# Altium PCB MacroPlay.PcbDoc (part 1 of 2)
Units mm, origin at the board's own origin, x right, y up, seen from the top; angles counter-clockwise.
Board outline 100 x 85.02 mm, 2 copper layers (Top Layer, Bottom Layer), stack 1.569 mm thick; 92 components, 57 nets, 335 pads, 121 vias.
Unrouted connection lines stored in the file: 18.
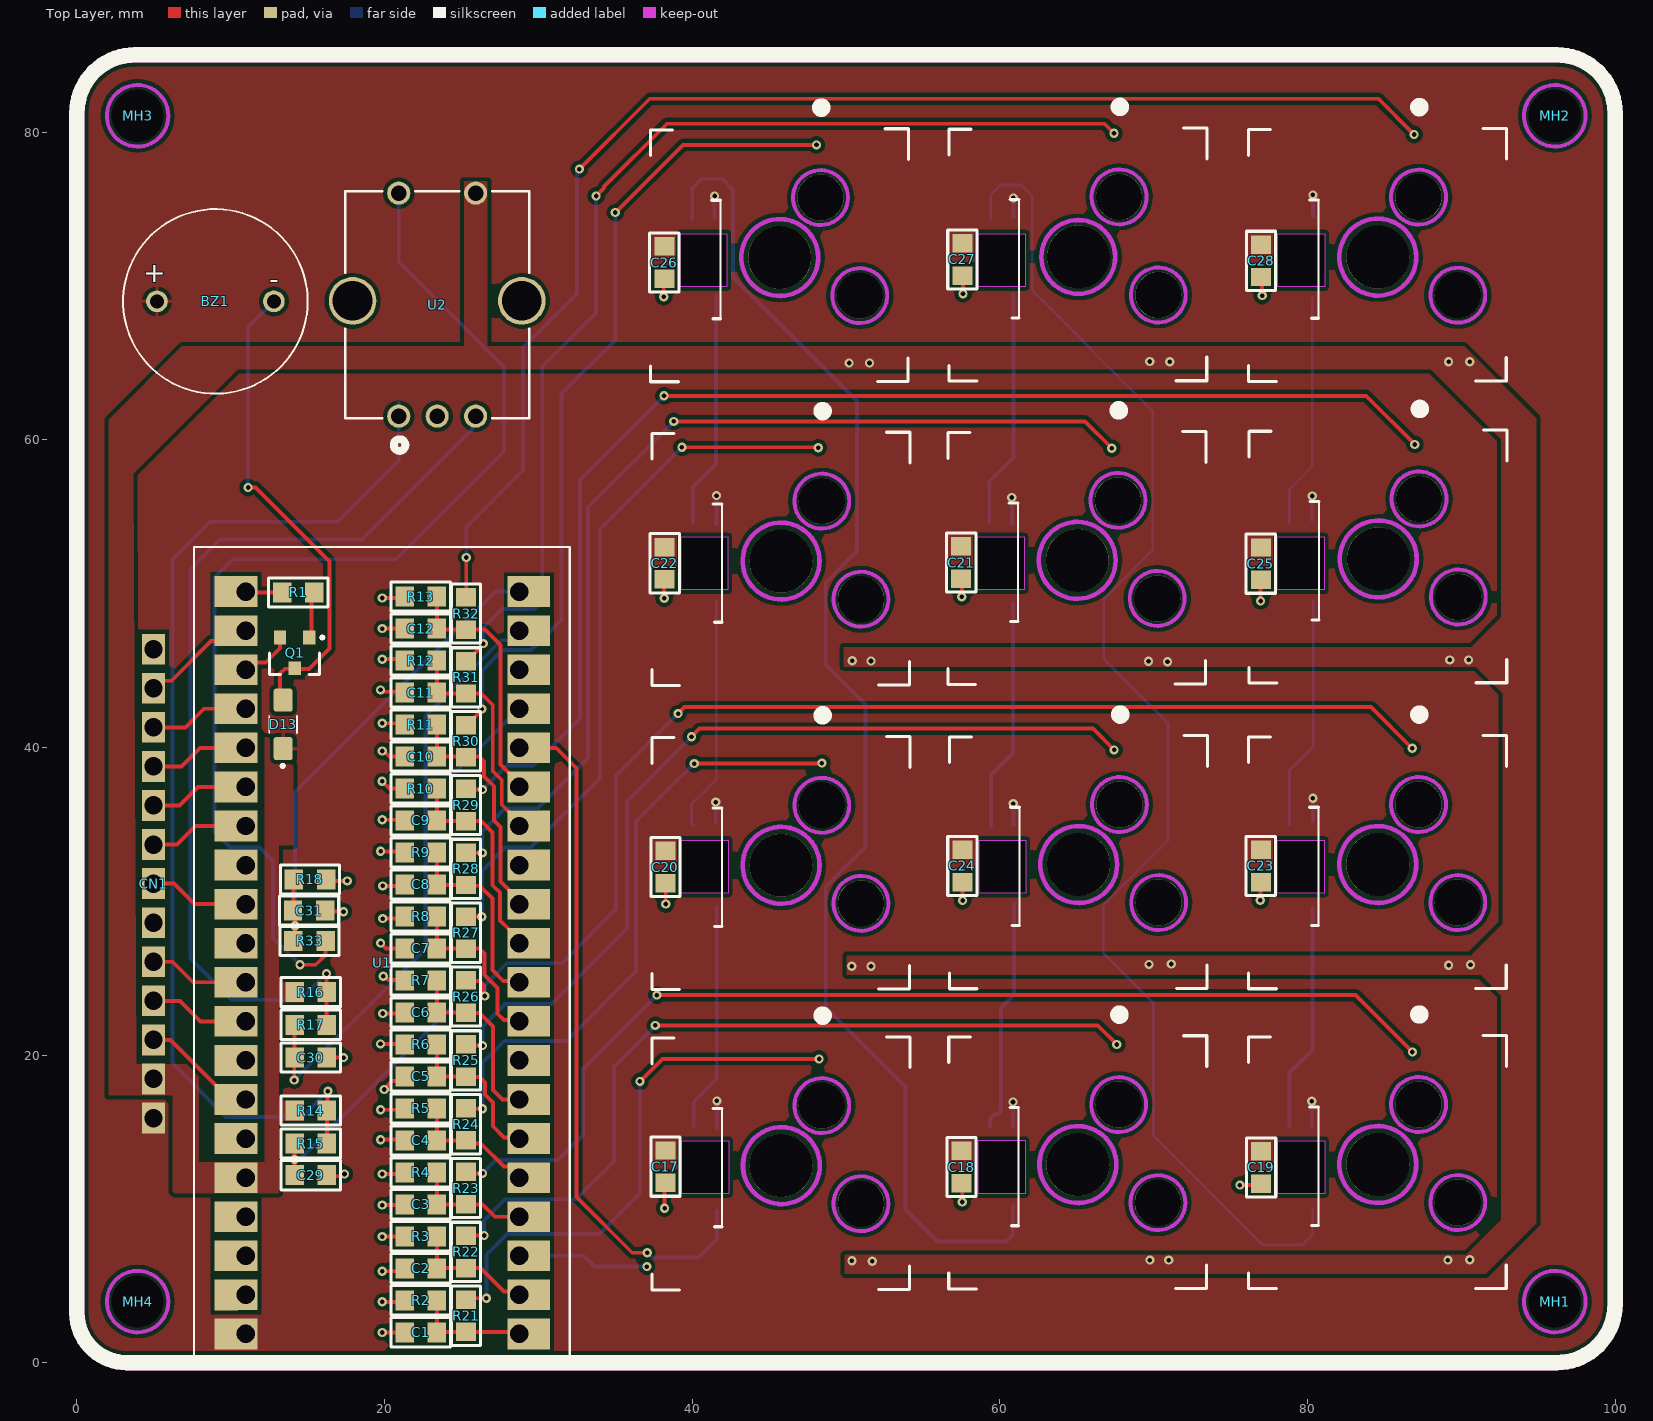
[diagram p0: Top Layer view]
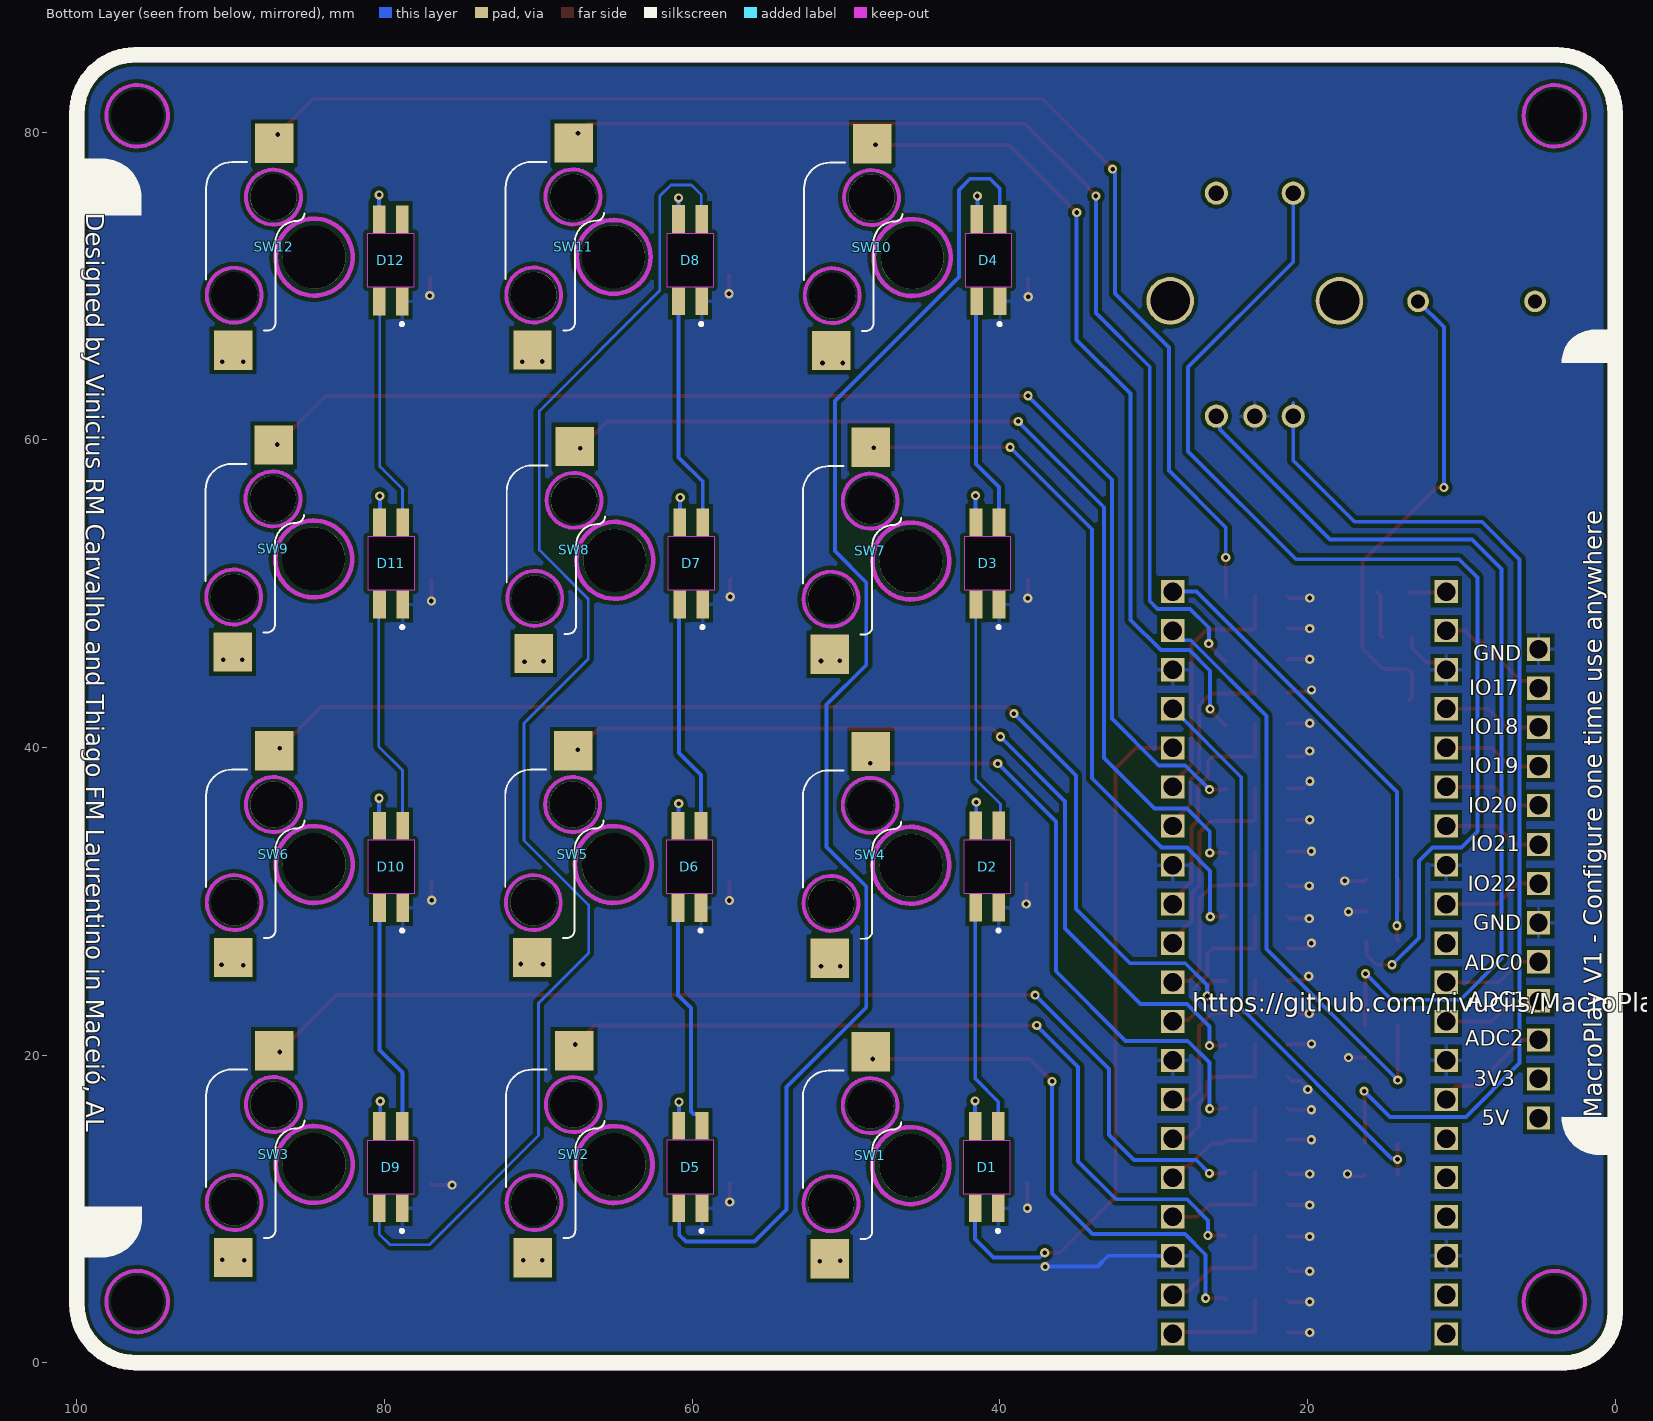
[diagram p1: Bottom Layer view, seen from below]

## Layer stack, top to bottom
Top Solder: solder mask 0.0102, Solder Resist, Dk 3.5
Top Layer: signal copper 0.035
Dielectric 1: core 1.4986, Core-043, Dk 4.3
Bottom Layer: signal copper 0.035
Bottom Solder: solder mask 0.0102, Solder Resist, Dk 3.5

## Board outline
27.033,0.007 12.677,0.007 3.233,0.007 cw(c3.233,3.245) -0.005,3.245 -0.005,81.245 cw(c3.775,81.245) 3.775,85.025 96.211,85.025 cw(c96.211,81.241) 99.995,81.241 99.995,3.801 cw(c96.201,3.801) 96.201,0.007

## Design rules (kind name [scope] priority, off if disabled: settings)
Clearance Clearance_LED [IsBoardCutoutRegion vs IsPad] p1: gap=0 ignorepadtopadclearanceinfootprint=FALSE
Clearance [All] p2: gap=0.254 ignorepadtopadclearanceinfootprint=FALSE except(0: Arc-Hole Track-Hole SMDPad-Hole THPad-Hole Via-Hole Fill-Hole Poly-Hole Region-Hole Text-Hole)
ComponentClearance TestPoints [HasFootprint('Test Point') vs HasFootprint('Test Point')] p1: gap=1.016 collisioncheckmode=3 verticalgap=0.254 showdistances=FALSE
ComponentClearance [All] p2: gap=0.254 collisioncheckmode=3 verticalgap=0.254 showdistances=FALSE
Height [All] p1: minheight=0 maxheight=50 prefheight=12.7
HoleSize [All] p1: absolutevalues=TRUE maxlimit=10 minlimit=0.025 maxpercent=80.000 minpercent=20.000
PolygonConnect "Relief 2312" [(HasFootprint('C2312') OR HasFootprint('R2312')OR HasFootprint('L2312')) AND IsPad vs IsPolygon] p1: thpad.connectstyle=Relief thpad.reliefconductorwidth=1.5 thpad.reliefentries=4 thpad.polygonreliefangle="90 Angle" thpad.airgapwidth=0.2 smdpad.connectstyle=Relief smdpad.reliefconductorwidth=1.5 smdpad.reliefentries=4 smdpad.polygonreliefangle="90 Angle" smdpad.airgapwidth=0.2 via.connectstyle=Direct via.reliefconductorwidth=0.254 via.reliefentries=4 via.polygonreliefangle="90 Angle" via.airgapwidth=0.254
PolygonConnect "Relief 1206" [(HasFootprint('C1206') OR HasFootprint('R1206') or HasFootprint('L1206')) AND IsPad vs IsPolygon] p2: thpad.connectstyle=Relief thpad.reliefconductorwidth=1.1 thpad.reliefentries=4 thpad.polygonreliefangle="90 Angle" thpad.airgapwidth=0.2 smdpad.connectstyle=Relief smdpad.reliefconductorwidth=1.1 smdpad.reliefentries=4 smdpad.polygonreliefangle="90 Angle" smdpad.airgapwidth=0.2 via.connectstyle=Direct via.reliefconductorwidth=0.254 via.reliefentries=4 via.polygonreliefangle="90 Angle" via.airgapwidth=0.254
PolygonConnect "Relief 0806" [(HasFootprint('C0805') OR HasFootprint('R0805') OR HasFootprint('L0805')) AND IsPad vs IsPolygon] p3: thpad.connectstyle=Relief thpad.reliefconductorwidth=0.7 thpad.reliefentries=4 thpad.polygonreliefangle="90 Angle" thpad.airgapwidth=0.254 smdpad.connectstyle=Relief smdpad.reliefconductorwidth=0.7 smdpad.reliefentries=4 smdpad.polygonreliefangle="90 Angle" smdpad.airgapwidth=0.254 via.connectstyle=Direct via.reliefconductorwidth=0.254 via.reliefentries=4 via.polygonreliefangle="90 Angle" via.airgapwidth=0.254
PolygonConnect "Relief 0603" [(HasFootprint('C0603') OR HasFootprint('R0603') OR HasFootprint('L0603')) AND IsPad vs IsPolygon] p4: thpad.connectstyle=Relief thpad.reliefconductorwidth=0.5 thpad.reliefentries=4 thpad.polygonreliefangle="90 Angle" thpad.airgapwidth=0.254 smdpad.connectstyle=Relief smdpad.reliefconductorwidth=0.5 smdpad.reliefentries=4 smdpad.polygonreliefangle="90 Angle" smdpad.airgapwidth=0.254 via.connectstyle=Direct via.reliefconductorwidth=0.254 via.reliefentries=4 via.polygonreliefangle="90 Angle" via.airgapwidth=0.254
PolygonConnect "Relief 0402" [(HasFootprint('C0402') OR HasFootprint('R0402') OR HasFootprint('L0402')) AND IsPad vs IsPolygon] p5: thpad.connectstyle=Relief thpad.reliefconductorwidth=0.3 thpad.reliefentries=4 thpad.polygonreliefangle="90 Angle" thpad.airgapwidth=0.127 smdpad.connectstyle=Relief smdpad.reliefconductorwidth=0.3 smdpad.reliefentries=4 smdpad.polygonreliefangle="90 Angle" smdpad.airgapwidth=0.127 via.connectstyle=Direct via.reliefconductorwidth=0.254 via.reliefentries=4 via.polygonreliefangle="90 Angle" via.airgapwidth=0.254
PolygonConnect [All] p6: thpad.connectstyle=Relief thpad.reliefconductorwidth=0.254 thpad.reliefentries=4 thpad.polygonreliefangle="90 Angle" thpad.airgapwidth=0.254 smdpad.connectstyle=Relief smdpad.reliefconductorwidth=0.254 smdpad.reliefentries=4 smdpad.polygonreliefangle="90 Angle" smdpad.airgapwidth=0.254 via.connectstyle=Direct via.reliefconductorwidth=0.254 via.reliefentries=4 via.polygonreliefangle="90 Angle" via.airgapwidth=0.254
RoutingVias [All] p1: holewidth=0.3 width=0.6 viastyle="Through Hole" minholewidth=0.3 minwidth=0.6 maxholewidth=8 maxwidth=10
SilkToSilkClearance SilkToSilkClearance_textOnTop [OnLayer('Top Overlay') vs (IsText OR IsTrack) AND OnLayer('Top Overlay')] p1: silktosilkclearance=0
SilkToSilkClearance SilkToSilkClearance_textOnTop_1 [OnLayer('Bottom Overlay') vs (IsText OR IsTrack) AND OnLayer('Bottom Overlay')] p2: silktosilkclearance=0
SilkToSilkClearance [All] p3: silktosilkclearance=0.254
SilkToSolderMaskClearance [IsPad] p1: minsilkscreentomaskgap=0.16 clearancetoexposedcopper=TRUE
SolderMaskExpansion [All] p1: expansion=0.102 istentingtop=FALSE
SupplyNets "Schematic Supply Nets_2" [InNet('+VBUS')] p1: voltage=0.000
SupplyNets "Schematic Supply Nets_1" [InNet('+3V3')] p2: voltage=0.000
SupplyNets "Schematic Supply Nets" [InNet('GND')] p3: voltage=0.000
Width [All] p1: maxlimit=10 minlimit=0.16 preferedwidth=0.254
25 further rules are at their usual default settings.

## Classes and differential pairs
component class "[05] - LEDS": C17 C18 C19 C20 C21 C22 C23 C24 C25 C26 C27 C28 D1 D2 D3 D4 D5 D6 D7 D8 D9 D10 D11 D12
component class "[04] - KEYS": C1 C2 C3 C4 C5 C6 C7 C8 C9 C10 C11 C12 R2 R3 R4 R5 R6 R7 R8 R9 R10 R11 R12 R13 R21 R22 R23 R24 R25 R26 R27 R28 R29 R30 R31 R32 SW1 SW2 SW3 SW4 SW5 SW6 SW7 SW8 SW9 SW10 SW11 SW12
component class "[03] - MICROCONTROLLER": BZ1 C29 C30 C31 CN1 D13 Q1 R1 R14 R15 R16 R17 R18 R33 U1 U2

## Components (designator, comment, footprint, x,y, rotation, side; value= is the part's Value field where it differs from the comment)
BZ1 "CMI-1275C-050" CUI_CMI-1275C-050 9,69 r0 top
C1 "100nF/50V" "C0805 - IRONSOLDERING" 22.345,1.983 r0 top value=100nF
C2 "100nF/50V" "C0805 - IRONSOLDERING" 22.345,6.142 r0 top value=100nF
C3 "100nF/50V" "C0805 - IRONSOLDERING" 22.345,10.3 r0 top value=100nF
C4 "100nF/50V" "C0805 - IRONSOLDERING" 22.345,14.459 r0 top value=100nF
C5 "100nF/50V" "C0805 - IRONSOLDERING" 22.345,18.618 r0 top value=100nF
C6 "100nF/50V" "C0805 - IRONSOLDERING" 22.345,22.777 r0 top value=100nF
C7 "100nF/50V" "C0805 - IRONSOLDERING" 22.345,26.935 r0 top value=100nF
C8 "100nF/50V" "C0805 - IRONSOLDERING" 22.345,31.094 r0 top value=100nF
C9 "100nF/50V" "C0805 - IRONSOLDERING" 22.345,35.253 r0 top value=100nF
C10 "100nF/50V" "C0805 - IRONSOLDERING" 22.345,39.411 r0 top value=100nF
C11 "100nF/50V" "C0805 - IRONSOLDERING" 22.345,43.57 r0 top value=100nF
C12 "100nF/50V" "C0805 - IRONSOLDERING" 22.345,47.729 r0 top value=100nF
C17 "100nF/50V" "C0805 - IRONSOLDERING" 38.258,12.75 r90 top value=100nF
C18 "100nF/50V" "C0805 - IRONSOLDERING" 57.508,12.725 r90 top value=100nF
C19 "100nF/50V" "C0805 - IRONSOLDERING" 76.983,12.7 r90 top value=100nF
C20 "100nF/50V" "C0805 - IRONSOLDERING" 38.258,32.225 r90 top value=100nF
C21 "100nF/50V" "C0805 - IRONSOLDERING" 57.483,52.025 r90 top value=100nF
C22 "100nF/50V" "C0805 - IRONSOLDERING" 38.208,51.975 r90 top value=100nF
C23 "100nF/50V" "C0805 - IRONSOLDERING" 76.958,32.3 r90 top value=100nF
C24 "100nF/50V" "C0805 - IRONSOLDERING" 57.558,32.3 r90 top value=100nF
C25 "100nF/50V" "C0805 - IRONSOLDERING" 76.958,51.95 r90 top value=100nF
C26 "100nF/50V" "C0805 - IRONSOLDERING" 38.183,71.525 r90 top value=100nF
C27 "100nF/50V" "C0805 - IRONSOLDERING" 57.558,71.725 r90 top value=100nF
C28 "100nF/50V" "C0805 - IRONSOLDERING" 76.98,71.635 r90 top value=100nF
C29 "100nF/50V" "C0805 - IRONSOLDERING" 15.195,12.195 r180 top value=100nF
C30 "100nF/50V" "C0805 - IRONSOLDERING" 15.195,19.845 r180 top value=100nF
C31 "100nF/50V" "C0805 - IRONSOLDERING" 15.095,29.395 r180 top value=100nF
CN1 "12PIN_HEADER" 12PINHEADER 4.975,31.15 r0 top
D1 "SK6812-E" LED_SK6812-E 40.845,12.72 r90 top locked
D2 "SK6812-E" LED_SK6812-E 40.808,32.25 r90 top
D3 "SK6812-E" LED_SK6812-E 40.795,51.97 r90 top locked
D4 "SK6812-E" LED_SK6812-E 40.733,71.675 r90 top
D5 "SK6812-E" LED_SK6812-E 60.108,12.725 r90 top
D6 "SK6812-E" LED_SK6812-E 60.17,32.245 r90 top
D7 "SK6812-E" LED_SK6812-E 60.058,51.975 r90 top
D8 "SK6812-E" LED_SK6812-E 60.133,71.675 r90 top
D9 "SK6812-E" LED_SK6812-E 79.595,12.72 r90 top locked
D10 "SK6812-E" LED_SK6812-E 79.57,32.245 r90 top locked
D11 "SK6812-E" LED_SK6812-E 79.57,51.97 r90 top locked
D12 "SK6812-E" LED_SK6812-E 79.595,71.67 r90 top locked
D13 "1N4007FL" SODFL3618X110N 13.4,41.5 r90 top
MH1 "MH_7.4MMC_3.2MMD" MH_7.4MMC_3.2MMD#1 96.238,3.977 r0 top
MH2 "MH_7.4MMC_3.2MMD" MH_7.4MMC_3.2MMD#2 98.904,81.065 r0 top
MH3 "MH_7.4MMC_3.2MMD" MH_7.4MMC_3.2MMD#3 4.535,84.302 r0 top
MH4 "MH_7.4MMC_3.2MMD" MH_7.4MMC_3.2MMD#4 3.014,4.904 r0 top
Q1 "MMBT2222A,215" SOT-23-3 14.15,46.15 r270 top
R1 "1K" "R0805 - IRONSOLDERING" 14.383,50.1 r0 top value=1kΩ
R2 "10K" "R0805 - IRONSOLDERING" 22.345,4.087 r0 top value=10kΩ
R3 "10K" "R0805 - IRONSOLDERING" 22.345,8.246 r0 top value=10kΩ
R4 "10K" "R0805 - IRONSOLDERING" 22.345,12.355 r180 top value=10kΩ
R5 "10K" "R0805 - IRONSOLDERING" 22.345,16.513 r180 top value=10kΩ
R6 "10K" "R0805 - IRONSOLDERING" 22.345,20.672 r180 top value=10kΩ
R7 "10K" "R0805 - IRONSOLDERING" 22.345,24.881 r0 top value=10kΩ
R8 "10K" "R0805 - IRONSOLDERING" 22.345,29.04 r0 top value=10kΩ
R9 "10K" "R0805 - IRONSOLDERING" 22.345,33.198 r0 top value=10kΩ
R10 "10K" "R0805 - IRONSOLDERING" 22.345,37.307 r180 top value=10kΩ
R11 "10K" "R0805 - IRONSOLDERING" 22.345,41.466 r180 top value=10kΩ
R12 "10K" "R0805 - IRONSOLDERING" 22.345,45.624 r180 top value=10kΩ
R13 "10K" "R0805 - IRONSOLDERING" 22.345,49.783 r180 top value=10kΩ
R14 "10K" "R0805 - IRONSOLDERING" 15.195,16.37 r180 top value=10kΩ
R15 "1K" "R0805 - IRONSOLDERING" 15.195,14.27 r0 top value=1kΩ
R16 "10K" "R0805 - IRONSOLDERING" 15.195,24.07 r180 top value=10kΩ
R17 "1K" "R0805 - IRONSOLDERING" 15.195,21.995 r0 top value=1kΩ
R18 "10K" "R0805 - IRONSOLDERING" 15.145,31.395 r180 top value=10kΩ
R21 "1K" "R0805 - IRONSOLDERING" 25.27,3.058 r90 top value=1kΩ
R22 "1K" "R0805 - IRONSOLDERING" 25.27,7.208 r90 top value=1kΩ
R23 "1K" "R0805 - IRONSOLDERING" 25.27,11.358 r90 top value=1kΩ
R24 "1K" "R0805 - IRONSOLDERING" 25.27,15.508 r90 top value=1kΩ
R25 "1K" "R0805 - IRONSOLDERING" 25.27,19.658 r90 top value=1kΩ
R26 "1K" "R0805 - IRONSOLDERING" 25.27,23.808 r90 top value=1kΩ
R27 "1K" "R0805 - IRONSOLDERING" 25.27,27.958 r90 top value=1kΩ
R28 "1K" "R0805 - IRONSOLDERING" 25.27,32.108 r90 top value=1kΩ
R29 "1K" "R0805 - IRONSOLDERING" 25.27,36.258 r90 top value=1kΩ
R30 "1K" "R0805 - IRONSOLDERING" 25.27,40.408 r90 top value=1kΩ
R31 "1K" "R0805 - IRONSOLDERING" 25.27,44.558 r90 top value=1kΩ
R32 "1K" "R0805 - IRONSOLDERING" 25.27,48.708 r90 top value=1kΩ
R33 "1K" "R0805 - IRONSOLDERING" 15.12,27.395 r180 top value=1kΩ
SW1 "PG151101S11" SW_PG151101S11 49.697,13.491 r90 top locked
SW2 "PG151101S11" SW_PG151101S11 68.997,13.557 r90 top locked
SW3 "PG151101S11" SW_PG151101S11 88.494,13.566 r90 top locked
SW4 "PG151101S11" SW_PG151101S11 49.697,33.016 r90 top locked
SW5 "PG151101S11" SW_PG151101S11 69.047,33.066 r90 top locked
SW6 "PG151101S11" SW_PG151101S11 88.494,33.066 r90 top locked
SW7 "PG151101S11" SW_PG151101S11 49.697,52.791 r90 top locked
SW8 "PG151101S11" SW_PG151101S11 68.951,52.841 r90 top locked
SW9 "PG151101S11" SW_PG151101S11 88.526,52.933 r90 top locked
SW10 "PG151101S11" SW_PG151101S11 49.614,72.524 r90 top locked
SW11 "PG151101S11" SW_PG151101S11 69.024,72.566 r90 top locked
SW12 "PG151101S11" SW_PG151101S11 88.494,72.552 r90 top locked
U1 "RASPBERRY_PI_PICO" RASPBERRY_PI_PICO 19.86,24.735 r180 top locked
U2 "EC11E18244A5" EC11E18244A5_ALPS 23.42,69.037 r0 top

## Footprints (in the part's own frame and the unit in brackets; to place one, negate y for a bottom-side part, rotate by r counter-clockwise, add the part's x,y. Pads: shape width x height; smd on the part's side, far side on the other; paste and mask are expansions set on the pad)
12PINHEADER [mm]
  rect 1.508x2 / inner round 1.508 / far side rect 1.508x1.508 hole 1.2 mask+0.1: 1(0,15.24) 2(0,12.7) 3(0,10.16) 4(0,7.62) 5(0,5.08) 6(0,2.54) 7(0,0) 8(0,-2.54) 9(0,-5.08) 10(0,-7.62) 11(0,-10.16) 12(0,-12.7) 13(0,-15.24)
"C0805 - IRONSOLDERING" [mm]
  rect 1.2x1.3 smd: 1(-1.05,0) 2(1.05,0)
  silkscreen extent -1.92,-0.95 1.92,0.95, body extent -1,-0.62 1,0.63, height 1
CUI_CMI-1275C-050 [mm]
  round 1.408 hole 0.9: N(3.8,0) P(-3.8,0)
  silkscreen extent -6,-6 6,6, body extent -6.02,-5.9 5.98,6.1, height 7.6
EC11E18244A5_ALPS [mil]
  round 122 hole 102 paste-99999 mask-61: 6(-216.54,0) 7(216.54,0)
  round 59 hole 39 paste-99999 mask+0: A(-98.43,-295.28) B(98.43,-295.28) C(0,-295.28) D(-98.43,275.59) E(98.43,275.59)
  silkscreen extent -236,-384 236,281, body extent -319,-330 311,300, height 1043
LED_SK6812-E [mm]
  rect 1.8x0.82 smd far side paste+0 mask+0.102: 1(2.675,-0.75) 2(2.675,0.75) 3(-2.675,0.75) 4(-2.675,-0.75)
  Keep-Out Layer board cut-out: 1.725,1.525 1.725,-1.525 -1.725,-1.525 -1.725,1.525
  body extent -2.91,-1.4 2.97,1.4, height 0.94
MH_7.4MMC_3.2MMD#1 [mm]
  round 0 hole 3.4 unplated: ""(-0.159,0)
MH_7.4MMC_3.2MMD#2 [mm]
  round 0 hole 3.4 unplated: ""(-2.825,0)
MH_7.4MMC_3.2MMD#3 [mm]
  round 0 hole 3.4 unplated: ""(-0.596,-3.237)
MH_7.4MMC_3.2MMD#4 [mm]
  round 0 hole 3.4 unplated: ""(0.925,-0.927)
"R0805 - IRONSOLDERING" [mm]
  rect 1.2x1.3 smd: 1(-1.05,-0.025) 2(1.05,-0.025)
  silkscreen extent -1.92,-0.98 1.92,0.92, body extent -1.05,-0.63 0.95,0.58, height 0.61
RASPBERRY_PI_PICO [mm]
  rect 1.508x2 / inner round 1.508 / far side rect 1.508x1.508 hole 1.2 mask+0.1: 3V3(8.89,12.7) 3V3_EN(8.89,15.24) ADC_VREF(8.89,10.16) AGND(8.89,5.08) GND(-8.89,17.78) GND(-8.89,5.08) GND(-8.89,-7.62) GND(-8.89,-20.32) GND(8.89,17.78) GND(8.89,-7.62) GND(8.89,-20.32) GP0(-8.89,22.86) GP1(-8.89,20.32) GP2(-8.89,15.24) GP3(-8.89,12.7) GP4(-8.89,10.16) GP5(-8.89,7.62) GP6(-8.89,2.54) GP7(-8.89,0) GP8(-8.89,-2.54) GP9(-8.89,-5.08) GP10(-8.89,-10.16) GP11(-8.89,-12.7) GP12(-8.89,-15.24) GP13(-8.89,-17.78) GP14(-8.89,-22.86) GP15(-8.89,-25.4) GP16(8.89,-25.4) GP17(8.89,-22.86) GP18(8.89,-17.78) GP19(8.89,-15.24) GP20(8.89,-12.7) GP21(8.89,-10.16) GP22(8.89,-5.08) GP26_A0(8.89,0) GP27_A1(8.89,2.54) GP28_A2(8.89,7.62) RUN(8.89,-2.54) VBUS(8.89,22.86) VSYS(8.89,20.32)
  rect 1.5x2 smd mask+0.1: 3V3(10.156,12.7) 3V3_EN(10.156,15.241) ADC_VREF(10.156,10.16) AGND(10.156,5.08) GND(-10.156,17.78) GND(-10.156,5.08) GND(-10.156,-7.62) GND(-10.156,-20.32) GND(10.156,17.78) GND(10.156,-7.62) GND(10.156,-20.32) GP0(-10.156,22.86) GP1(-10.156,20.32) GP2(-10.156,15.24) GP3(-10.156,12.7) GP4(-10.156,10.16) GP5(-10.156,7.62) GP6(-10.156,2.54) GP7(-10.156,0) GP8(-10.156,-2.54) GP9(-10.156,-5.08) GP10(-10.156,-10.16) GP11(-10.156,-12.7) GP12(-10.156,-15.24) GP13(-10.156,-17.78) GP14(-10.156,-22.85) GP15(-10.156,-25.4) GP16(10.156,-25.4) GP17(10.156,-22.86) GP18(10.156,-17.78) GP19(10.156,-15.24) GP20(10.156,-12.7) GP21(10.156,-10.16) GP22(10.156,-5.08) GP26_A0(10.156,0) GP27_A1(10.156,2.54) GP28_A2(10.156,7.62) RUN(10.156,-2.54) VBUS(10.156,22.86) VSYS(10.156,20.325)
  silkscreen extent -12.18,-28.3 12.25,25.05, body extent -10.46,-26.77 10.54,25.53, height 5.93
SODFL3618X110N [mm]
  rrect25% 1.5x1.22 smd: 1(-1.575,0) 2(1.575,0)
  silkscreen extent -2.8,-0.9 0.55,0.9, body extent -1.9,-0.92 1.9,0.88, height 1.3
SOT-23-3 [mm] "SOT23, 3-Leads, Body 2,90x2,40mm, Pitch 1,05mm, IPC Medium Density"
  rect 0.9x0.8 smd mask+0.08: 1(-1,0.95) 2(-1,-0.95) 3(1,0)
  silkscreen extent -1.1,-1.62 1.4,1.9, body extent -1.27,-1.5 1.28,1.5, height 1.15
SW_PG151101S11 [mm]
  rect 2.55x2.5 smd far side: 1(6.725,1.325) 2(-6.725,-1.35)
  round 3 hole 3 unplated: ""(-3.15,-1.275) ""(3.225,1.275)
  round 4.089 hole 4.089 unplated: ""(-0.675,3.925)
  silkscreen extent -8.75,-4.45 9.17,12.33, body extent -9.05,-4.62 7.95,12.38, height 17

## Part data
BZ1: "12 mm, 5 Vdc, 90 dB, 3.1 kHz, Through Hole, Magnetic Audio Indicator Buzzer", Package=None, Check_prices=https://www.snapeda.com/parts/CMI-1275C-050/Same+Sky/view-part/?ref=eda, MF="Same Sky", MP=CMI-1275C-050, SnapEDA_Link=https://www.snapeda.com/parts/CMI-1275C-050/Same+Sky/view-part/?ref=snap
C1 C2 C3 C4 C5 C6 C7 C8 C9 C10 C11 C12: library part CL21B104KBCNNNC, "MLCC - 100nF 50V X7R 0805 ±10%", Case Code (Imperial)=0805, Case Code (Metric)=2012, Dielectric=X7R, Dielectric Material=Ceramic, Manufacturer="Samsung Electro-Mechanics", Max Operating Temperature=125°C, Min Operating Temperature=-55°C, Tolerance=10%, Voltage=50V, .Mounting=SMD, Case/Package=0805, Category="Ceramic Capacitors", China RoHS=Compliant, ComponentLink1Description=https://datasheet.octopart.com:443/CL21B104KBCNNNC-Samsung-Electro-Mechanics-datasheet-137745078.pdf?src-supplier=IHS, ComponentLink1URL=https://datasheet.octopart.com:443/CL21B104KBCNNNC-Samsung-Electro-Mechanics-datasheet-137745078.pdf?src-supplier=IHS, ComponentLink2Description=https://datasheet.octopart.com/CL21B104KBCNNNC-Samsung-Electro-Mechanics-datasheet-8324245.pdf, ComponentLink2URL=https://datasheet.octopart.com/CL21B104KBCNNNC-Samsung-Electro-Mechanics-datasheet-8324245.pdf, ComponentLink3Description=https://datasheet.octopart.com/CL21B104KBCNNNC-Samsung-Electro-Mechanics-datasheet-97040617.pdf, ComponentLink3URL=https://datasheet.octopart.com/CL21B104KBCNNNC-Samsung-Electro-Mechanics-datasheet-97040617.pdf, ComponentLink4Description=https://datasheet.octopart.com/General-Multilayer-Ceramic-Capacitors-Samsung-datasheet-family-111.pdf, ComponentLink4URL=https://datasheet.octopart.com/General-Multilayer-Ceramic-Capacitors-Samsung-datasheet-family-111.pdf, ComponentLink5Description=https://datasheet.octopart.com:443/CL21B104KBCNNNC-Samsung-Electro-Mechanics-datasheet-11548950.pdf?src-supplier=Future+Electronics, ComponentLink5URL=https://datasheet.octopart.com:443/CL21B104KBCNNNC-Samsung-Electro-Mechanics-datasheet-11548950.pdf?src-supplier=Future+Electronics, ComponentLink6Description=https://datasheet.octopart.com:443/CL21B104KBCNNNC-Samsung-Electro-Mechanics-datasheet-116891032.pdf?src-supplier=Future+Electronics, ComponentLink6URL=https://datasheet.octopart.com:443/CL21B104KBCNNNC-Samsung-Electro-Mechanics-datasheet-116891032.pdf?src-supplier=Future+Electronics, ComponentLink7Description=https://datasheet.octopart.com:443/CL21B104KBCNNNC-Samsung-Electro-Mechanics-datasheet-81462175.pdf?src-supplier=Future+Electronics, ComponentLink7URL=https://datasheet.octopart.com:443/CL21B104KBCNNNC-Samsung-Electro-Mechanics-datasheet-81462175.pdf?src-supplier=Future+Electronics, ComponentLink8Description=https://datasheet.octopart.com:443/CL21B104KBCNNNC-Samsung-datasheet-42485244.pdf?src-supplier=Future+Electronics, ComponentLink8URL=https://datasheet.octopart.com:443/CL21B104KBCNNNC-Samsung-datasheet-42485244.pdf?src-supplier=Future+Electronics, ComponentLink9Description=https://datasheet.octopart.com:443/CL21B104KBCNNNC-Samsung-Electro-Mechanics-datasheet-149045937.pdf?src-supplier=Future+Electronics, ComponentLink9URL=https://datasheet.octopart.com:443/CL21B104KBCNNNC-Samsung-Electro-Mechanics-datasheet-149045937.pdf?src-supplier=Future+Electronics, ComponentLink10Description=https://datasheet.octopart.com:443/CL21B104KBCNNNC-Samsung-datasheet-8326407.pdf?src-supplier=TME, ComponentLink10URL=https://datasheet.octopart.com:443/CL21B104KBCNNNC-Samsung-datasheet-8326407.pdf?src-supplier=TME, ComponentLink11Description=http://sigma.octopart.com:80/rohs_certificate/General-Multilayer-Ceramic-Capacitors-Samsung-family-110.pdf?src-supplier=Compliance+Statements, ComponentLink11URL=http://sigma.octopart.com:80/rohs_certificate/General-Multilayer-Ceramic-Capacitors-Samsung-family-110.pdf?src-supplier=Compliance+Statements, ComponentLink12Description=http://sigma.octopart.com:80/rohs_statement/General-Multilayer-Ceramic-Capacitors-Samsung-family-132.pdf?src-supplier=Compliance+Statements, ComponentLink12URL=http://sigma.octopart.com:80/rohs_statement/General-Multilayer-Ceramic-Capacitors-Samsung-family-132.pdf?src-supplier=Compliance+Statements, ComponentLink13Description=http://sigma.octopart.com:80/reach_statement/General-Multilayer-Ceramic-Capacitors-Samsung-family-133.pdf?src-supplier=Compliance+Statements, ComponentLink13URL=http://sigma.octopart.com:80/reach_statement/General-Multilayer-Ceramic-Capacitors-Samsung-family-133.pdf?src-supplier=Compliance+Statements, Contact Plating=Tin, Country of Origin="Mainland China, Philippines, South Korea", Depth=1.25mm, Export Control Classification Number (ECCN) Code=EAR99, Harmonized Tariff Schedule (HTS) Code=8532.24.00.20, Height=950µm, Introduction Date=2009-07-27, Lead Free="Lead Free", Length=2mm, Lifecycle Status=Production, Manufacturer Part Number=CL21B104KBCNNNC, Material=Ceramic, Mounting Technology="Surface Mount", Number of Terminals=2, Pricing="4000=0,0059, 16000=0,0057, 60000=0,0055, 100000=0,0054, 200000=0,0052 (USD)", Radiation Hardening=No, REACH SVHC=Yes, RoHS=Compliant, Schedule B="8532240020, 8532240020|8532240020, 8532240020|8532240020|8532240020, 8532240020|8532240020|8532240020|8532240020", Stock=6136000, Supplier="Future Electronics", Supplier Part Number=CL21B104KBCNNNC, Thickness=939.8µm, Voltage Rating=50V, Voltage Rating (DC)=50V, Width=1.25mm
C17 C18 C19 C20 C21 C22 C23 C24 C25 C26 C27 C28 C29 C30 C31: library part CL21B104KBCNNNC, "MLCC - 100nF 50V X7R 08025 ±10%", Case Code (Imperial)=0805, Case Code (Metric)=2012, Dielectric=X7R, Dielectric Material=Ceramic, Manufacturer="Samsung Electro-Mechanics", Max Operating Temperature=125°C, Min Operating Temperature=-55°C, Tolerance=10%, Voltage=50V, .Mounting=SMD, Case/Package=0805, Category="Ceramic Capacitors", China RoHS=Compliant, ComponentLink1Description=https://datasheet.octopart.com:443/CL21B104KBCNNNC-Samsung-Electro-Mechanics-datasheet-137745078.pdf?src-supplier=IHS, ComponentLink1URL=https://datasheet.octopart.com:443/CL21B104KBCNNNC-Samsung-Electro-Mechanics-datasheet-137745078.pdf?src-supplier=IHS, ComponentLink2Description=https://datasheet.octopart.com/CL21B104KBCNNNC-Samsung-Electro-Mechanics-datasheet-8324245.pdf, ComponentLink2URL=https://datasheet.octopart.com/CL21B104KBCNNNC-Samsung-Electro-Mechanics-datasheet-8324245.pdf, ComponentLink3Description=https://datasheet.octopart.com/CL21B104KBCNNNC-Samsung-Electro-Mechanics-datasheet-97040617.pdf, ComponentLink3URL=https://datasheet.octopart.com/CL21B104KBCNNNC-Samsung-Electro-Mechanics-datasheet-97040617.pdf, ComponentLink4Description=https://datasheet.octopart.com/General-Multilayer-Ceramic-Capacitors-Samsung-datasheet-family-111.pdf, ComponentLink4URL=https://datasheet.octopart.com/General-Multilayer-Ceramic-Capacitors-Samsung-datasheet-family-111.pdf, ComponentLink5Description=https://datasheet.octopart.com:443/CL21B104KBCNNNC-Samsung-Electro-Mechanics-datasheet-11548950.pdf?src-supplier=Future+Electronics, ComponentLink5URL=https://datasheet.octopart.com:443/CL21B104KBCNNNC-Samsung-Electro-Mechanics-datasheet-11548950.pdf?src-supplier=Future+Electronics, ComponentLink6Description=https://datasheet.octopart.com:443/CL21B104KBCNNNC-Samsung-Electro-Mechanics-datasheet-116891032.pdf?src-supplier=Future+Electronics, ComponentLink6URL=https://datasheet.octopart.com:443/CL21B104KBCNNNC-Samsung-Electro-Mechanics-datasheet-116891032.pdf?src-supplier=Future+Electronics, ComponentLink7Description=https://datasheet.octopart.com:443/CL21B104KBCNNNC-Samsung-Electro-Mechanics-datasheet-81462175.pdf?src-supplier=Future+Electronics, ComponentLink7URL=https://datasheet.octopart.com:443/CL21B104KBCNNNC-Samsung-Electro-Mechanics-datasheet-81462175.pdf?src-supplier=Future+Electronics, ComponentLink8Description=https://datasheet.octopart.com:443/CL21B104KBCNNNC-Samsung-datasheet-42485244.pdf?src-supplier=Future+Electronics, ComponentLink8URL=https://datasheet.octopart.com:443/CL21B104KBCNNNC-Samsung-datasheet-42485244.pdf?src-supplier=Future+Electronics, ComponentLink9Description=https://datasheet.octopart.com:443/CL21B104KBCNNNC-Samsung-Electro-Mechanics-datasheet-149045937.pdf?src-supplier=Future+Electronics, ComponentLink9URL=https://datasheet.octopart.com:443/CL21B104KBCNNNC-Samsung-Electro-Mechanics-datasheet-149045937.pdf?src-supplier=Future+Electronics, ComponentLink10Description=https://datasheet.octopart.com:443/CL21B104KBCNNNC-Samsung-datasheet-8326407.pdf?src-supplier=TME, ComponentLink10URL=https://datasheet.octopart.com:443/CL21B104KBCNNNC-Samsung-datasheet-8326407.pdf?src-supplier=TME, ComponentLink11Description=http://sigma.octopart.com:80/rohs_certificate/General-Multilayer-Ceramic-Capacitors-Samsung-family-110.pdf?src-supplier=Compliance+Statements, ComponentLink11URL=http://sigma.octopart.com:80/rohs_certificate/General-Multilayer-Ceramic-Capacitors-Samsung-family-110.pdf?src-supplier=Compliance+Statements, ComponentLink12Description=http://sigma.octopart.com:80/rohs_statement/General-Multilayer-Ceramic-Capacitors-Samsung-family-132.pdf?src-supplier=Compliance+Statements, ComponentLink12URL=http://sigma.octopart.com:80/rohs_statement/General-Multilayer-Ceramic-Capacitors-Samsung-family-132.pdf?src-supplier=Compliance+Statements, ComponentLink13Description=http://sigma.octopart.com:80/reach_statement/General-Multilayer-Ceramic-Capacitors-Samsung-family-133.pdf?src-supplier=Compliance+Statements, ComponentLink13URL=http://sigma.octopart.com:80/reach_statement/General-Multilayer-Ceramic-Capacitors-Samsung-family-133.pdf?src-supplier=Compliance+Statements, Contact Plating=Tin, Country of Origin="Mainland China, Philippines, South Korea", Depth=1.25mm, Export Control Classification Number (ECCN) Code=EAR99, Harmonized Tariff Schedule (HTS) Code=8532.24.00.20, Height=950µm, Introduction Date=2009-07-27, Lead Free="Lead Free", Length=2mm, Lifecycle Status=Production, Manufacturer Part Number=CL21B104KBCNNNC, Material=Ceramic, Mounting Technology="Surface Mount", Number of Terminals=2, Pricing="4000=0,0059, 16000=0,0057, 60000=0,0055, 100000=0,0054, 200000=0,0052 (USD)", Radiation Hardening=No, REACH SVHC=Yes, RoHS=Compliant, Schedule B="8532240020, 8532240020|8532240020, 8532240020|8532240020|8532240020, 8532240020|8532240020|8532240020|8532240020", Stock=6136000, Supplier="Future Electronics", Supplier Part Number=CL21B104KBCNNNC, Thickness=939.8µm, Voltage Rating=50V, Voltage Rating (DC)=50V, Width=1.25mm
CN1: "12PIN HEADER CONNECTOR"
D1 D2 D3 D4 D5 D6 D7 D8 D9 D10 D11 D12: "DIODE - SK6812MINI-E is a smart LED control circuit and light emitting circuit in one controlled LED source, which has the shape of a 3528 LED chip.", Package=Package, Check_prices=https://www.snapeda.com/parts/SK6812-E/DONGGUANG+OPSCO+OPTOELECTRONICS+CO.%252C+LTD/view-part/?ref=eda, MF="DONGGUANG OPSCO OPTOELECTRONICS CO., LTD", MP=SK6812-E, SnapEDA_Link=https://www.snapeda.com/parts/SK6812-E/DONGGUANG+OPSCO+OPTOELECTRONICS+CO.%252C+LTD/view-part/?ref=snap
D13: "Diode - Standard 1000 V 1A Surface Mount SOD-123FL", Package=None, Check_prices=https://www.snapeda.com/parts/1N4007FL/SMC/view-part/?ref=eda, MF="SMC Diode Solutions", MP=1N4007FL, SnapEDA_Link=https://www.snapeda.com/parts/1N4007FL/SMC/view-part/?ref=snap
MH1 MH2 MH3 MH4: "Mounting Hole 7.4mm Diameter 3.2mm Drill"
Q1: "TRANS - Single Bipolar Transistor, NPN, 40 V, 600 mA, 250 mW, SOT-23 (TO-236AB), 3 Pins, Surface Mount", Ambient Temperature Range High=150°C, Case/Package=SOT-23, Clock Frequency=300MHz, Collector Base Voltage (VCBO)=75V, Collector Emitter Breakdown Voltage=40V, Collector Emitter Saturation Voltage=1V, Emitter Base Voltage (VEBO)=6V, Manufacturer=Nexperia, Manufacturer Lifecycle Status="RELEASED FOR SUPPLY", Max Collector Current=600mA, Max Power Dissipation=250mW, Min Operating Temperature=-65°C, Ratings=AEC-Q101, Category=BJTs, China RoHS=Compliant, Collector Emitter Voltage (VCEO)=40V, ComponentLink1Description=https://sigma.octopart.com:443/138797052/technical_drawing/Nexperia-MMBT2222A%2C215.pdf?src-supplier=Upverter, ComponentLink1URL=https://sigma.octopart.com:443/138797052/technical_drawing/Nexperia-MMBT2222A%2C215.pdf?src-supplier=Upverter, ComponentLink2Description=https://datasheet.octopart.com:443/MMBT2222A%2C215-Nexperia-datasheet-87581373.pdf?src-supplier=LKR, ComponentLink2URL=https://datasheet.octopart.com:443/MMBT2222A%2C215-Nexperia-datasheet-87581373.pdf?src-supplier=LKR, ComponentLink3Description=https://datasheet.octopart.com:443/MMBT2222A%2C215-Nexperia-datasheet-8386369.pdf?src-supplier=element14+APAC, ComponentLink3URL=https://datasheet.octopart.com:443/MMBT2222A%2C215-Nexperia-datasheet-8386369.pdf?src-supplier=element14+APAC, ComponentLink4Description=https://datasheet.octopart.com:443/MMBT2222A%2C215-Nexperia-datasheet-8884867.pdf?src-supplier=element14+APAC, ComponentLink4URL=https://datasheet.octopart.com:443/MMBT2222A%2C215-Nexperia-datasheet-8884867.pdf?src-supplier=element14+APAC, ComponentLink5Description=https://datasheet.octopart.com:443/MMBT2222A%2C215-Nexperia-datasheet-180923983.pdf?src-supplier=IHS, ComponentLink5URL=https://datasheet.octopart.com:443/MMBT2222A%2C215-Nexperia-datasheet-180923983.pdf?src-supplier=IHS, ComponentLink6Description=https://datasheet.octopart.com:443/MMBT2222A%2C215-Philips-datasheet-14064901.pdf?src-supplier=iiiC, ComponentLink6URL=https://datasheet.octopart.com:443/MMBT2222A%2C215-Philips-datasheet-14064901.pdf?src-supplier=iiiC, ComponentLink7Description=http://sigma.octopart.com:80/reach_statement/NXP-Semiconductors-company-13.pdf?src-supplier=Compliance+Statements, ComponentLink7URL=http://sigma.octopart.com:80/reach_statement/NXP-Semiconductors-company-13.pdf?src-supplier=Compliance+Statements, ComponentLink8Description=http://sigma.octopart.com:80/rohs_statement/NXP-Semiconductors-company-12.pdf?src-supplier=Compliance+Statements, ComponentLink8URL=http://sigma.octopart.com:80/rohs_statement/NXP-Semiconductors-company-12.pdf?src-supplier=Compliance+Statements, Contact Plating=Tin, Country of Origin="Mainland China, Malaysia", Element Configuration=Single, Export Control Classification Number (ECCN) Code=EAR99, Frequency=300MHz, Gain Bandwidth Product=300MHz, Height=1.1mm, hFE Min=40, Introduction Date=2003-04-28, Lead Free="Lead Free", Length=3mm, Lifecycle Status=Production, Manufacturer Part Number=MMBT2222A,215, Max Breakdown Voltage=40V, Max Junction Temperature (Tj)=150°C, Max Operating Temperature=150°C, Mounting Technology="Surface Mount", Number of Elements=1, Number of Terminals=3, Pins=3, Polarity=NPN, Power Dissipation=250mW, Pricing="1=0,269, 10=0,167, 25=0,145, 50=0,124 (USD)", Radiation Hardening=No, REACH SVHC=Yes, RoHS=Compliant, Schedule B="8541210080, 8541210080|8541210080|8541210080|8541210080|8541210080", Stock=23090, Supplier=Newark, Supplier Part Number=MMBT2222A,215, Termination=SMD/SMT, Transition Frequency=300MHz, Weight=4.535924g, Width=1.4mm
R1 R15 R17 R21 R22 R23 R24 R25 R26 R27 R28 R29 R30 R31 R32 R33: library part RR1220P-102-D, "RES - 1K 0.1W 0805 ±0.5% Chip Resistor", Case Code (Imperial)=0805, Manufacturer=Susumu, Manufacturer Package Identifier="0805 (2012 metric)", Max Operating Temperature=125°C, Max Power Dissipation=100mW, Min Operating Temperature=-55°C, Temperature Coefficient=25ppm/°C, Tolerance=0.5%, Voltage Rating=100V, .Mounting=SMD, Case/Package=0805, Category="Chip SMD Resistors", ComponentLink1Description=https://datasheet.octopart.com:443/RR1220P-102-D-Susumu-datasheet-159770900.pdf?src-supplier=Newark, ComponentLink1URL=https://datasheet.octopart.com:443/RR1220P-102-D-Susumu-datasheet-159770900.pdf?src-supplier=Newark, ComponentLink2Description=https://datasheet.octopart.com:443/RR1220P-102-D-Susumu-datasheet-5302462.pdf?src-supplier=Newark, ComponentLink2URL=https://datasheet.octopart.com:443/RR1220P-102-D-Susumu-datasheet-5302462.pdf?src-supplier=Newark, ComponentLink3Description=https://datasheet.octopart.com:443/RR1220P-102-D-Susumu-datasheet-722.pdf?src-supplier=Newark, ComponentLink3URL=https://datasheet.octopart.com:443/RR1220P-102-D-Susumu-datasheet-722.pdf?src-supplier=Newark, ComponentLink4Description=https://datasheet.octopart.com:443/RR1220P-102-D-Susumu-datasheet-78834971.pdf?src-supplier=Farnell, ComponentLink4URL=https://datasheet.octopart.com:443/RR1220P-102-D-Susumu-datasheet-78834971.pdf?src-supplier=Farnell, ComponentLink5Description=https://datasheet.octopart.com:443/RR1220P-102-D-Susumu-datasheet-10941792.pdf?src-supplier=element14+APAC, ComponentLink5URL=https://datasheet.octopart.com:443/RR1220P-102-D-Susumu-datasheet-10941792.pdf?src-supplier=element14+APAC, ComponentLink6Description=https://datasheet.octopart.com:443/RR1220P-102-D-Susumu-datasheet-62069792.pdf?src-supplier=Future+Electronics, ComponentLink6URL=https://datasheet.octopart.com:443/RR1220P-102-D-Susumu-datasheet-62069792.pdf?src-supplier=Future+Electronics, ComponentLink7Description=https://datasheet.octopart.com:443/RR1220P-102-D-Susumu-datasheet-11047391.pdf?src-supplier=Future+Electronics, ComponentLink7URL=https://datasheet.octopart.com:443/RR1220P-102-D-Susumu-datasheet-11047391.pdf?src-supplier=Future+Electronics, ComponentLink8Description=https://datasheet.octopart.com:443/RR1220P-102-D-Susumu-datasheet-118815.pdf?src-supplier=DigiKey, ComponentLink8URL=https://datasheet.octopart.com:443/RR1220P-102-D-Susumu-datasheet-118815.pdf?src-supplier=DigiKey, Composition="Thin Film", Country of Origin="Mainland China, Japan", Depth=1.25mm, Export Control Classification Number (ECCN) Code=EAR99, Harmonized Tariff Schedule (HTS) Code=8533.21.00.30, Height=400µm, Introduction Date=2004-01-27, Lead Free="Lead Free", Length=2mm, Lifecycle Status=NRND, Manufacturer Part Number=RR1220P-102-D, Mounting Technology="Surface Mount", Number of Terminals=2, Number of Terminations=2, Packaging="Cut Tape", Pins=2, Power Rating=100mW, Pricing="5000=0,0159, 15000=0,0155, 25000=0,0153, 50000=0,0151, 100000=0,0147 (USD)", REACH SVHC=No, RoHS=Compliant, Stock=25000, Supplier="Future Electronics", Supplier Part Number=RR1220P-102-D, Termination=SMD/SMT, Voltage Rating (DC)=100V, Width=1.25mm, Working Voltage=100V
R2 R3 R4 R5 R6 R7 R8 R9 R10 R11 R12 R13 R14 R16 R18: library part RMCF0805FT10K0, "RES - 10K 1/16W 0805 ±1% Chip Resistor", Case Code (Imperial)=0805, Case Code (Metric)=2012, Manufacturer="Stackpole Electronics", Manufacturer Package Identifier="0805 (2012 metric)", Max Operating Temperature=155°C, Max Power Dissipation=125mW, Min Operating Temperature=-55°C, Ratings=AEC-Q200, Temperature Coefficient=100ppm/°C, Tolerance=1%, Voltage Rating=150V, .Mounting=SMD, Case/Package=0805, Category="Chip SMD Resistors", China RoHS=Non-Compliant, ComponentLink1Description=https://datasheet.octopart.com:443/RMCF0805FT10K0-Stackpole-Electronics-datasheet-182148065.pdf?src-supplier=IHS, ComponentLink1URL=https://datasheet.octopart.com:443/RMCF0805FT10K0-Stackpole-Electronics-datasheet-182148065.pdf?src-supplier=IHS, ComponentLink2Description=https://datasheet.octopart.com:443/RMCF0805FT10K0-Stackpole-Electronics-datasheet-12534581.pdf?src-supplier=Upverter, ComponentLink2URL=https://datasheet.octopart.com:443/RMCF0805FT10K0-Stackpole-Electronics-datasheet-12534581.pdf?src-supplier=Upverter, ComponentLink3Description=https://datasheet.octopart.com:443/RMCF0805FT10K0-Stackpole-Electronics-datasheet-12510902.pdf?src-supplier=Upverter, ComponentLink3URL=https://datasheet.octopart.com:443/RMCF0805FT10K0-Stackpole-Electronics-datasheet-12510902.pdf?src-supplier=Upverter, ComponentLink4Description=https://datasheet.octopart.com:443/RMCF0805FT10K0-Stackpole-Electronics-datasheet-28504820.pdf?src-supplier=Master+Electronics, ComponentLink4URL=https://datasheet.octopart.com:443/RMCF0805FT10K0-Stackpole-Electronics-datasheet-28504820.pdf?src-supplier=Master+Electronics, ComponentLink5Description=https://datasheet.octopart.com:443/RMCF0805FT10K0-Stackpole-Electronics-datasheet-141193804.pdf?src-supplier=Stackpole+Electronics, ComponentLink5URL=https://datasheet.octopart.com:443/RMCF0805FT10K0-Stackpole-Electronics-datasheet-141193804.pdf?src-supplier=Stackpole+Electronics, ComponentLink6Description=https://datasheet.octopart.com:443/RMCF0805FT10K0-Stackpole-Electronics-datasheet-62091608.pdf?src-supplier=Stackpole+Electronics, ComponentLink6URL=https://datasheet.octopart.com:443/RMCF0805FT10K0-Stackpole-Electronics-datasheet-62091608.pdf?src-supplier=Stackpole+Electronics, ComponentLink7Description=https://datasheet.octopart.com:443/RMCF0805FT10K0-Stackpole-Electronics-datasheet-10788263.pdf?src-supplier=Stackpole+Electronics, ComponentLink7URL=https://datasheet.octopart.com:443/RMCF0805FT10K0-Stackpole-Electronics-datasheet-10788263.pdf?src-supplier=Stackpole+Electronics, ComponentLink8Description=https://datasheet.octopart.com:443/RMCF0805FT10K0-Stackpole-Electronics-datasheet-154799224.pdf?src-supplier=JRH+Electronics, ComponentLink8URL=https://datasheet.octopart.com:443/RMCF0805FT10K0-Stackpole-Electronics-datasheet-154799224.pdf?src-supplier=JRH+Electronics, ComponentLink9Description=https://datasheet.octopart.com:443/RMCF0805FT10K0-Stackpole-Electronics-datasheet-11546843.pdf?src-supplier=Arrow+Electronics, ComponentLink9URL=https://datasheet.octopart.com:443/RMCF0805FT10K0-Stackpole-Electronics-datasheet-11546843.pdf?src-supplier=Arrow+Electronics, ComponentLink10Description=https://datasheet.octopart.com:443/RMCF0805FT10K0-Stackpole-Electronics-datasheet-11547379.pdf?src-supplier=Future+Electronics, ComponentLink10URL=https://datasheet.octopart.com:443/RMCF0805FT10K0-Stackpole-Electronics-datasheet-11547379.pdf?src-supplier=Future+Electronics, ComponentLink11Description=https://datasheet.octopart.com:443/RMCF0805FT10K0-Stackpole-Electronics-datasheet-8359789.pdf?src-supplier=Future+Electronics, ComponentLink11URL=https://datasheet.octopart.com:443/RMCF0805FT10K0-Stackpole-Electronics-datasheet-8359789.pdf?src-supplier=Future+Electronics, ComponentLink12Description=https://datasheet.octopart.com:443/RMCF0805FT10K0-Stackpole-Electronics-datasheet-8324226.pdf?src-supplier=Future+Electronics, ComponentLink12URL=https://datasheet.octopart.com:443/RMCF0805FT10K0-Stackpole-Electronics-datasheet-8324226.pdf?src-supplier=Future+Electronics, ComponentLink13Description=https://datasheet.octopart.com:443/RMCF0805FT10K0-Stackpole-Electronics-datasheet-8088878.pdf?src-supplier=Future+Electronics, ComponentLink13URL=https://datasheet.octopart.com:443/RMCF0805FT10K0-Stackpole-Electronics-datasheet-8088878.pdf?src-supplier=Future+Electronics, ComponentLink14Description=https://datasheet.octopart.com:443/RMCF0805FT10K0-Stackpole-Electronics-datasheet-5313682.pdf?src-supplier=Future+Electronics, ComponentLink14URL=https://datasheet.octopart.com:443/RMCF0805FT10K0-Stackpole-Electronics-datasheet-5313682.pdf?src-supplier=Future+Electronics, ComponentLink15Description=http://sigma.octopart.com:80/15940719/materials_sheet/Stackpole-Electronics-RMCF0805FT10K0.pdf?src-supplier=Compliance+Statements, ComponentLink15URL=http://sigma.octopart.com:80/15940719/materials_sheet/Stackpole-Electronics-RMCF0805FT10K0.pdf?src-supplier=Compliance+Statements, ComponentLink16Description=http://sigma.octopart.com:80/141158211/reach_statement/Stackpole-Electronics-RMCF0805FT10K0.pdf?src-supplier=Compliance+Statements, ComponentLink16URL=http://sigma.octopart.com:80/141158211/reach_statement/Stackpole-Electronics-RMCF0805FT10K0.pdf?src-supplier=Compliance+Statements, ComponentLink17Description=http://sigma.octopart.com:80/141158212/rohs_statement/Stackpole-Electronics-RMCF0805FT10K0.pdf?src-supplier=Compliance+Statements, ComponentLink17URL=http://sigma.octopart.com:80/141158212/rohs_statement/Stackpole-Electronics-RMCF0805FT10K0.pdf?src-supplier=Compliance+Statements, Composition="Thick Film", Contact Plating=Tin, Depth=1.25mm, Features="Automotive AEC-Q200", Height=500µm, Lead Free="Lead Free", Length=2mm, Lifecycle Status=Production, Manufacturer Part Number=RMCF0805FT10K0, Military Standard=Not, Mounting Technology="Surface Mount", Number of Terminals=2, Number of Terminations=2, Packaging="Cut Tape (CT)", Power Rating=125mW, Pricing="10000=0,0027, 25000=0,0027, 100000=0,0026, 150000=0,0025, 375000=0,0024 (USD)", Radiation Hardening=No, REACH SVHC=Yes, RoHS=Compliant, Schedule B="8533210045, 8533210045|8533210045, 8533210045|8533210045|8533210045, 8533210045|8533210045|8533210045|8533210045", Stock=3170000, Supplier="Future Electronics", Supplier Part Number=RMCF0805FT10K0, Width=1.25mm, Working Voltage=150V
SW1 SW2 SW3 SW4 SW5 SW6 SW7 SW8 SW9 SW10 SW11 SW12: "SWITCH - Kailh socket for hotswap mechanical switches", Package=Package, .Mounting=SMD, Check_prices=https://www.snapeda.com/parts/PG151101S11/Kailh/view-part/?ref=eda, MF=Kailh, MP=PG151101S11, SnapEDA_Link=https://www.snapeda.com/parts/PG151101S11/Kailh/view-part/?ref=snap
U1: "MCU Module - Raspberry Pi Board, Arm Cortex-M0+; Core Architecture:Arm; Core Sub-Architecture:Cortex-M0+; Kit Contents:Raspberry Pi Pico Board; No. Of Bits:32Bit; Silicon Core Number:Rp2040; Silicon Manufacturer:Raspberry Pi", Package=None, .Mounting="SMD or PTH variant", Check_prices=https://www.snapeda.com/parts/RASPBERRY%20PI%20PICO/Raspberry+Pi/view-part/?ref=eda, MF="Raspberry Pi", MP="RASPBERRY PI PICO", SnapEDA_Link=https://www.snapeda.com/parts/RASPBERRY%20PI%20PICO/Raspberry+Pi/view-part/?ref=snap
U2: "ENCODER - Rotary Encoder Incremental 18 Quadrature (Incremental) Vertical", Manufacturer 1="Alps Electric", Copyright="Copyright (C) 2025 Ultra Librarian. All rights reserved.", Manufacturer Part Number 1=EC11E18244A5, RefDes=RefDes, Type=Type

## Via types
v1: diameter 0.6, hole 0.3, Top Layer to Bottom Layer, tented both sides, 85 vias
v2: diameter 0.6, hole 0.3, Top Layer to Bottom Layer, tented top, 36 vias

## Nets (pads, with @x,y where several pads share a name; then routed paths per layer and width w, separated by ;. In a path a pad name is that pad's centre, name@x,y a point inside that pad or via, vN(x,y) a via of type N, cw(c..) or ccw(c..) an arc to the next point about the centre after c; other vN are vias at no path point)
+3V3: CN1.12 R14.2 R16.2 SW1.2 SW2.2 SW3.2 SW4.2 SW5.2 SW6.2 SW7.2 SW8.2 SW9.2 SW10.2 SW11.2 SW12.2 U1.3V3 U2.E
  other v2: 51.7,6.6 50.38,6.629 69.75,6.675 70.975,6.675 89.125,6.675 90.55,6.7 50.37,25.77 51.62,25.77 89.17,25.845 90.595,25.87 69.695,25.895 71.145,25.92 70.895,45.57 69.66,45.6 51.62,45.62 50.395,45.645 89.245,45.695 90.47,45.695 50.195,64.995 51.52,64.995 71.045,65.07 89.17,65.07 90.545,65.07 69.745,65.095
+VBUS: BZ1.P C17.2 C18.2 C19.2 C20.2 C21.2 C22.2 C23.2 C24.2 C25.2 C26.2 C27.2 C28.2 CN1.13 D1.1 D2.1 D3.1 D4.1 D5.1 D6.1 D7.1 D8.1 D9.1 D10.1 D11.1 D12.1 D13.1 U1.VBUS | length 18.4
  Bottom Layer w0.254: D4.1@41.45,74.432 v1(41.45,75.85) ; D2.1@41.525,35.071 v1(41.525,36.45) ; D3.1@41.525,54.556 41.575,54.606 v1(41.575,56.375) ; D1.1@41.6,15.267 v1(41.6,17.025) ; D7.1@60.775,54.563 v1(60.775,56.25) ; D5.1@60.85,15.366 v1(60.85,16.95) ; D6.1@60.875,34.958 v1(60.875,36.35) ; D8.1@60.879,74.484 v1(60.879,75.725) ; D9.1@80.275,15.391 v1(80.275,17) ; D11.1@80.3,54.821 v1(80.3,56.35) ; D10.1@80.35,35.22 v1(80.35,36.7) ; v1(80.35,75.925) 80.35,74.535 D12.1@80.4,74.485
A: C1.2 R2.2 R21.1 U1.GP0 | length 7.5
  Top Layer w0.254: R2.2 23.395,2.008 28.617,2.008 U1.GP0@28.75,1.875
A1: C2.2 R3.2 R22.1 U1.GP1 | length 8.2
  Top Layer w0.254: R3.2 C2.2 23.411,6.158 R22.1 26.232,6.158 27.764,4.626 28.539,4.626 U1.GP1@28.75,4.415
A2: C3.2 R4.1 R23.1 U1.GP2 | length 7.8
  Top Layer w0.254: R4.1 C3.2 26.364,10.3 27.17,9.495 U1.GP2@28.75,9.495
ADC0: CN1.9 U1.GP26_A0 | length 6.5
  Top Layer w0.254: CN1.9 6.205,26.07 7.54,24.735 U1.GP26_A0@10.97,24.735
ADC1: CN1.10 U1.GP27_A1 | length 6.5
  Top Layer w0.254: CN1.10 6.695,23.53 8.03,22.195 9.704,22.195 U1.GP27_A1@10.97,22.195
ADC2: CN1.11 U1.GP28_A2 | length 7.7
  Top Layer w0.254: CN1.11 6.08,20.99 9.082,17.988 10.343,17.988 10.97,17.361 U1.GP28_A2@10.97,17.115
B: C4.2 R5.1 R24.1 U1.GP3 | length 8.5
  Top Layer w0.254: R5.1 C4.2 23.396,14.458 R24.1 25.49,14.263 26.252,14.263 27.764,12.751 28.123,12.751 28.75,12.124 U1.GP3@28.75,12.035
B1: C5.2 R6.1 R25.1 U1.GP4 | length 10.5
  Top Layer w0.254: R6.1 C5.2 23.405,18.608 R25.1 25.315,18.588 26.177,18.588 26.537,18.228 26.537,17.428 27.039,16.926 27.039,15.376 27.764,14.651 28.674,14.651 U1.GP4@28.75,14.575
B2: C6.2 R7.2 R26.1 U1.GP5 | length 12.2
  Top Layer w0.254: R7.2 C6.2 23.413,22.758 R26.1 25.315,22.738 26.177,22.738 27.045,21.87 27.045,17.745 27.675,17.115 U1.GP5@28.75,17.115
C: C7.2 R8.2 R27.1 U1.GP6 | length 11.2
  Top Layer w0.254: R8.2 C7.2 25.295,26.935 26.155,26.935 26.493,26.597 26.493,25.215 27.351,24.357 27.351,22.689 27.764,22.276 28.669,22.276 U1.GP6@28.75,22.195
C1: C8.2 R9.2 R28.1 U1.GP7 | length 12.8
  Top Layer w0.254: R9.2 C8.2 23.431,31.058 R28.1 25.34,31.013 26.177,31.013 27.001,30.189 27.001,25.539 27.714,24.826 28.659,24.826 U1.GP7@28.75,24.735
C2: C9.2 R10.1 R29.1 U1.GP8 | length 13.9
  Top Layer w0.254: R10.1 C9.2 23.439,35.208 26.282,35.208 27.026,34.464 27.026,31.046 27.509,30.563 27.509,28.756 28.117,28.148 28.123,28.148 28.75,27.521 U1.GP8@28.75,27.275
D: C10.2 R11.1 R30.1 U1.GP9 | length 15.5
  Top Layer w0.254: R11.1 C10.2 25.295,39.411 26.153,39.411 26.462,39.103 26.462,38.124 27.107,37.479 27.107,35.258 27.534,34.831 27.534,31.277 28.75,30.061 U1.GP9@28.75,29.815
D1: C11.2 R12.1 R31.1 U1.GP10 | length 14.6
  Top Layer w0.254: R12.1 C11.2 23.457,43.508 R31.1 26.282,43.508 27.029,42.761 27.029,38.461 27.615,37.875 27.615,36.275 U1.GP10@28.122,35.768 ; U1.GP10@28.123,35.768 28.75,35.141 U1.GP10@28.75,34.895
D2: C12.2 R13.1 R32.1 U1.GP11 | length 16.4
  Top Layer w0.254: R13.1 C12.2 23.465,47.658 R32.1 26.532,47.658 27.537,46.653 27.537,38.894 28.75,37.681 U1.GP11@28.75,37.435
ENCODER_A: C29.2 R15.1 U1.GP13 | length 37.6
  Top Layer w0.254: C29.2 v1(14.145,13.22) R15.1
  Bottom Layer w0.254: v1(14.145,13.22) 14.21,13.285 14.535,13.285 24.3,23.05 24.3,38.065 U1.GP13@28.75,42.515
ENCODER_B: C30.2 R17.1 U1.GP14 | length 39.2
  Top Layer w0.254: v1(14.125,18.375) 14.125,19.825 C30.2 R17.1
  Bottom Layer w0.254: v1(14.125,18.375) 22.658,26.908 22.658,42.042 27.585,46.968 28.123,46.968 U1.GP14@28.75,47.595
ENCODER_PUSH: C31.2 R18.2 R33.2 U1.GP15 | length 32.8
  Top Layer w0.254: R33.2 14.181,27.531 v1(14.181,28.413) ; v1@14.07,28.413 14.181,28.524 14.181,29.284 14.07,29.395 14.07,31.395 R18.2
  Bottom Layer w0.254: v1(14.181,28.413) 14.181,37.106 27.21,50.135 U1.GP15@28.75,50.135
GND: C1.1 C2.1 C3.1 C4.1 C5.1 C6.1 C7.1 C8.1 C9.1 C10.1 C11.1 C12.1 C17.1 C18.1 C19.1 C20.1 C21.1 C22.1 C23.1 C24.1 C25.1 C26.1 C27.1 C28.1 C29.1 C30.1 C31.1 CN1.1 CN1.8 D1.3 D2.3 D3.3 D4.3 D5.3 D6.3 D7.3 D8.3 D9.3 D10.3 D11.3 D12.3 Q1.2 R2.1 R3.1 R4.2 R5.2 R6.2 R7.1 R8.1 R9.1 R10.2 R11.2 R12.2 R13.2 R18.1 U1.AGND U1.GND U2.C | length 69.3
  Top Layer w0.254: U1.GND@10.97,45.055 11.44,45.525 12.275,45.525 13.2,46.45 Q1.2 ; C31.1 16.215,29.325 v1(17.325,29.325) ; R18.1 16.29,31.325 v1(17.575,31.325) ; C29.1 16.315,12.125 17.152,12.125 17.296,12.269 v1(17.39,12.269) ; C30.1 16.249,19.84 v1(17.33,19.84) ; v1(19.731,43.744) 19.825,43.744 19.944,43.625 21.24,43.625 C11.1 ; v1(19.732,20.731) 21.261,20.731 R6.2 ; v1(19.74,14.504) 21.25,14.504 C4.1 ; v1(19.74,16.451) 21.207,16.451 R5.2 ; v1(19.74,27.281) 20.085,26.935 C7.1 ; v1(19.74,33.249) 21.219,33.249 R9.1 ; v1(19.835,37.798) 19.848,37.798 20.314,37.332 R10.2 ; v1(19.85,1.97) 21.282,1.97 C1.1 ; v1(19.85,3.96) 21.192,3.96 R2.1 ; v1(19.85,5.949) 21.102,5.949 C2.1 ; v1(19.85,8.2) 21.274,8.2 R3.1 ; v1(19.85,10.25) 21.244,10.25 C3.1 ; v1(19.85,12.275) 21.19,12.275 R4.2 ; v1(19.85,35.3) 21.247,35.3 C9.1 ; v1(19.85,39.772) 19.944,39.772 20.304,39.411 C10.1 ; v1(19.85,41.575) 21.21,41.575 R11.2 ; v1(19.85,45.741) 21.203,45.741 R12.2 ; v1(19.85,47.73) 21.293,47.73 C12.1 ; v1(19.85,49.72) 21.207,49.72 R13.2 ; v1(19.875,28.875) 21.155,28.875 R8.1 ; v1(19.875,31) 21.201,31 C8.1 ; v1(19.877,22.706) 21.225,22.706 C6.1 ; v1(19.909,25.122) 20.002,25.122 20.244,24.881 21.27,24.881 R7.1 ; v1(19.975,17.762) 19.975,17.841 20.463,18.328 21.005,18.328 C5.1 ; v1(38.146,69.302) 38.146,70.437 C26.1 ; v1(38.175,49.7) 38.175,50.892 C22.1 ; v1(38.2,10.05) 38.2,11.642 C17.1 ; C20.1 38.275,31.158 v1(38.275,29.825) ; C21.1 57.525,50.933 v1(57.525,49.8) ; C18.1 57.55,11.633 v1(57.55,10.45) ; C24.1 57.575,31.233 v1(57.575,30.05) ; C27.1 57.604,70.629 v1(57.604,69.5) ; v1(75.6,11.55) 76.883,11.55 C19.1 ; v1(76.93,30.065) 76.93,31.222 C23.1 ; v1(76.95,49.525) 76.95,50.892 C25.1 ; C28.1 77.05,70.514 v1(77.05,69.375)
  Bottom Layer w0.254: U1.GND@28.75,6.955 32.944,6.955 33.649,6.25 v1(37.05,6.25)
GP17: CN1.2 U1.GP17 | length 7.6
  Top Layer w0.254: CN1.2 5.461,44.336 6.136,44.336 8.722,46.922 9.081,46.922 9.67,47.511 9.67,47.595 U1.GP17@10.97,47.595
GP18: CN1.3 U1.GP18 | length 6.5
  Top Layer w0.254: CN1.3 7.06,41.31 8.265,42.515 U1.GP18@10.97,42.515
GP19: CN1.4 U1.GP19 | length 6.5
  Top Layer w0.254: CN1.4 6.795,38.77 8,39.975 U1.GP19@10.97,39.975
GP20: CN1.5 U1.GP20 | length 6.5
  Top Layer w0.254: CN1.5 6.655,36.23 7.86,37.435 U1.GP20@10.97,37.435
GP21: CN1.6 U1.GP21 | length 6.5
  Top Layer w0.254: CN1.6 6.49,33.69 7.695,34.895 U1.GP21@10.97,34.895
GP22: CN1.7 U1.GP22 | length 6.5
  Top Layer w0.254: CN1.7 6.3,31.15 7.635,29.815 U1.GP22@10.97,29.815
NetBZ1_N: BZ1.N D13.2 Q1.3 | length 31.5